# Altium PCB ECE362_BuckV2.PcbDoc (part 2 of 2)
Units mm, origin at the board's own origin, x right, y up, seen from the top; angles counter-clockwise.
Board outline 100 x 80 mm, 4 copper layers (Top Layer, GND, Power, Bottom Layer), stack 1.586 mm thick; 122 components, 85 nets, 403 pads, 248 vias.
Unrouted connection lines stored in the file: 1.
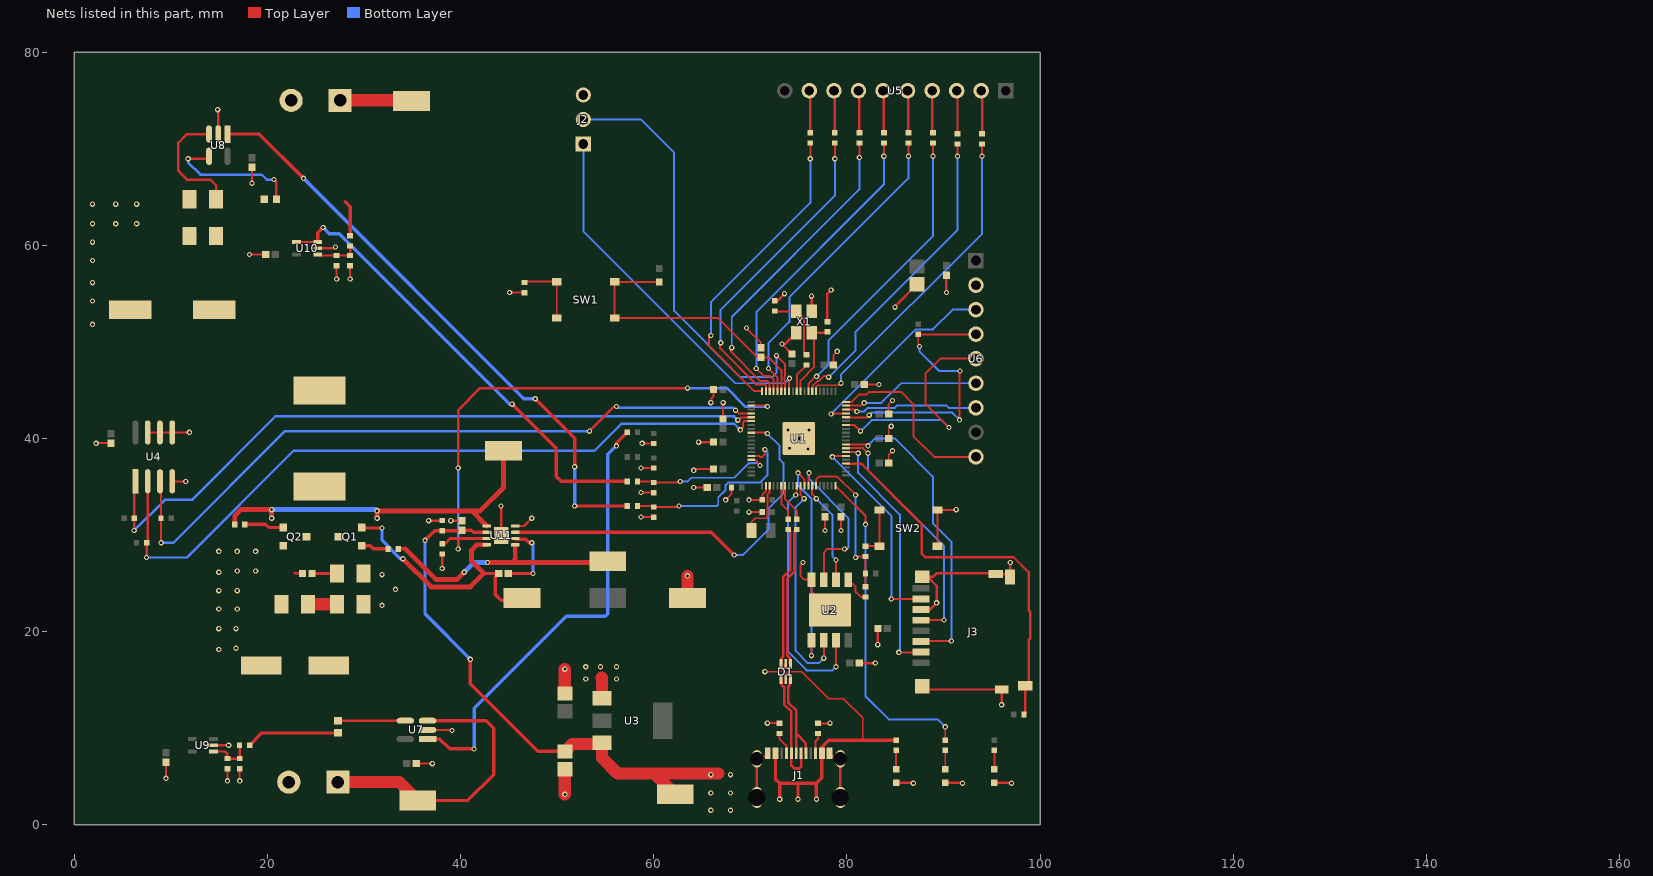
[diagram p4: the nets of this part, all layers, seen from the top]

## Via types
v1: diameter 0.55, hole 0.3, Top Layer to Bottom Layer, 248 vias

## Nets (pads, with @x,y where several pads share a name; then routed paths per layer and width w, separated by ;. In a path a pad name is that pad's centre, name@x,y a point inside that pad or via, vN(x,y) a via of type N, cw(c..) or ccw(c..) an arc to the next point about the centre after c; other vN are vias at no path point) (continued)
ADC4: C34.2 R33.2 U1.55 | length 20.4
  Top Layer w0.203: R33.2@58.31,33.02 59.89,33.02 C34.2@60,32.91 62.501,32.91 v1(62.611,33.02) ; U1.55@70.103,38.2 70.893,38.2 70.993,38.1 71.247,38.1 71.501,38.354 v1(71.501,38.862)
  Bottom Layer w0.203: v1(62.611,33.02) 66.548,33.02 66.675,33.147 66.675,33.909 67.437,34.671 67.437,35.179 67.691,35.433 70.993,35.433 71.755,36.195 71.755,38.608 v1(71.501,38.862)
ADC5: C30.2 R31.2 U1.56 | length 14.9
  Top Layer w0.203: R31.2@58.31,35.56 59.89,35.56 C30.2@60,35.45 62.628,35.45 v1(62.738,35.56) ; U1.56@70.103,37.8 70.417,37.8 70.478,37.739 70.586,37.739 70.588,37.739 70.722,37.605 70.722,37.495 v1@70.993,37.224
  Bottom Layer w0.203: v1(62.738,35.56) 63.5,35.56 63.881,35.941 68.326,35.941 69.85,37.465 70.739,37.465 v1(70.993,37.211)
BOOTSEL: R4.1 SW2.2 SW2.4 | length 5.2
  Top Layer w0.203: R4.1@81.915,28.846 81.928,28.859 SW2.2@83.36,28.859 SW2.4@83.36,32.609
BOOTSEL_X: R4.2 R5.2 R37.1 U1.75 | length 16.4
  Top Layer w0.203: U1.75@76.8,35.103 76.8,35.779 77.089,36.068 78.994,36.068 v1(80.899,34.163) ; v1(80.899,27.686) 81.009,27.796 R4.2@81.915,27.796 R37.1@81.915,26.035 R5.2@81.915,24.655
  Bottom Layer w0.203: v1(80.899,27.686) v1(80.899,34.163)
Col1: R16.1 U5.2 | length 4.5
  Top Layer w0.254: U5.2@93.89,76 93.98,75.91 R16.1@93.98,71.535
Col1_X: R16.2 U1.26 | length 34
  Top Layer w0.203: U1.26@76.8,44.897 76.808,44.905 76.808,45.329 76.995,45.516 79.077,45.516 79.281,45.72 v1(79.375,45.72) ; v1(93.98,69.215) R16.2@93.98,70.485
  Bottom Layer w0.203: v1(79.375,45.72) 79.375,46.609 93.98,61.214 v1(93.98,69.215)
Col2: R17.1 U5.3 | length 4.5
  Top Layer w0.254: U5.3@91.35,76 91.44,75.91 R17.1@91.44,71.535
Col2_X: R17.2 U1.27 | length 32.4
  Top Layer w0.203: U1.27@76.4,44.897 76.408,44.905 76.408,45.396 76.943,45.93 77.073,45.93 77.624,46.482 77.978,46.482 v1(78.105,46.355) ; v1(91.44,69.215) R17.2@91.44,70.485
  Bottom Layer w0.203: v1(78.105,46.355) 80.899,49.149 80.899,51.054 91.44,61.595 v1(91.44,69.215)
Col3: R18.1 U5.4 | length 4.4
  Top Layer w0.254: U5.4@88.81,76 88.81,71.735 R18.1@88.9,71.645
Col3_X: R18.2 U1.28 | length 31.1
  Top Layer w0.203: U1.28@76,44.897 76,45.647 76.787,46.434 v1(76.864,46.434) ; v1(88.9,69.215) R18.2@88.9,70.595
  Bottom Layer w0.203: v1(76.864,46.434) 78.055,47.625 78.105,47.625 78.105,50.165 88.9,60.96 v1(88.9,69.215)
Col4: R19.1 U5.5 | length 4.4
  Top Layer w0.254: U5.5@86.27,76 86.36,75.91 R19.1@86.36,71.645
Col4_X: R19.2 U1.36 | length 32.1
  Top Layer w0.203: v1(71.882,47.244) 72.8,46.326 U1.36@72.8,44.897 ; v1(86.36,69.215) R19.2@86.36,70.595
  Bottom Layer w0.203: v1(71.882,47.244) 71.882,49.911 74.041,52.07 74.041,54.61 86.36,66.929 v1(86.36,69.215)
CS_X: R5.1 U2.1 | length 2.8
  Top Layer w0.203: U2.1@80.137,25.4 80.899,24.638 80.899,24.13 81.424,23.605 R5.1@81.915,23.605
FLASH_SClK: U1.71 U2.6 | length 23.1
  Top Layer w0.203: U1.71@75.2,35.103 75.2,34.147 v1(75.565,33.782) ; v1(77.597,17.272) U2.6@77.597,19.1
  Bottom Layer w0.203: v1(75.565,33.782) 74.676,32.893 74.676,18.034 75.946,16.764 77.089,16.764 v1(77.597,17.272)
GD_EN: R13.2 U1.42 U11.7 | length 55.7
  Top Layer w0.203: U1.42@70.103,43.4 71.662,43.4 v1(71.755,43.307)
  Top Layer w0.272: R13.2@38.1,29.1 38.371,29.1 38.918,29.647 39.751,29.647 ; v1(39.751,28.575) 39.751,29.647 ; v1(39.751,36.957) 39.751,42.926 42.037,45.212 v1(63.5,45.212) ; U11.7@42.721,29.647 39.751,29.647
  Bottom Layer w0.272: v1(39.751,28.575) v1(39.751,36.957) ; v1(63.5,45.212) 67.564,45.212 69.469,43.307 v1(71.755,43.307)
GND: C1.1 C2.1 C3.1 C4.1 C5.1 C6.1 C7.1 C8.1 C9.1 C10.1 C11.1 C12.1 C13.1 C14.1 C15.1 C16.1 C17.1 C18.2 C19.2 C20.1 C21.1 C22.1 C23.1 C24.1 C25.1 C26.1 C27.1 C28.1 C29.1 C30.1 C31.1 C32.1 C33.1 C34.1 C35.1 C37.1 C38.1 C39.1 C40.1 C41.1 C42.1 C43.1 C44.1 C45.2 C46.2 C47.1 D1.2 D2.1 D3.1 D4.1 J1.1 J1.2 J1.3 J1.4 J1.A1-B12 J1.B1-A12 J2.3 J3.6 J3.10 J3.11 J3.12 J3.13 J3.14 J4.2 J5.2 J13.1 Q2.2 R7.1 R8.2 R9.2 R13.1 R27.1 R28.1 SW2.1 SW2.3 U1.62 U1.81 U2.4 U2.9 U3.1 U4.4 U4.5 U4.6 U4.7 U6.2 U7.2 U8.2 U9.2 U10.2 U11.4 U11.9 X1.2 X1.4 | length 159.6
  Top Layer w0.152: v1(71.501,15.875) 72.855,15.875 72.962,15.982 73.394,15.982 73.513,16.101 73.513,16.533 D1.2@73.66,16.68 ; C2.1@84.31,37.465 84.31,38.336 v1(84.709,38.735) ; C14.1@84.31,40.005 84.31,41.003 v1(84.582,41.275)
  Top Layer w0.203: v1(2.286,39.497) 2.304,39.515 C24.1@3.81,39.515 ; U4.7@7.62,40.625 U4.6@8.89,40.625 U4.5@10.16,40.625 11.923,40.625 v1(11.938,40.64) ; v1(9.525,4.826) C31.1@9.525,6.495 ; U4.4@10.16,35.575 11.542,35.575 v1(11.557,35.56) ; v1(15.875,4.572) C28.1@15.875,5.825 ; v1(17.145,4.572) R27.1@17.145,5.825 ; v1(18.161,59.055) C32.1@19.83,59.055 ; v1(27.178,56.515) C35.1@27.178,57.895 ; v1(28.575,56.515) R28.1@28.575,57.895 ; C27.1@35.415,6.35 v1(37.084,6.35) ; U7.2@36.591,9.845 39.05,9.845 v1(39.116,9.779) ; v1(45.085,55.118) 45.102,55.101 R7.1@46.609,55.101 ; v1(58.674,31.877) 58.691,31.86 C34.1@60,31.86 ; v1(58.674,34.417) 58.691,34.4 C30.1@60,34.4 ; v1(58.674,36.957) 58.691,36.94 C29.1@60,36.94 ; v1(58.801,39.497) 58.818,39.48 C33.1@60,39.48 ; v1(64.135,34.925) C8.1@65.55,34.925 ; v1(64.135,36.703) 64.262,36.83 C7.1@66.185,36.83 ; v1(65.913,43.709) 65.979,43.775 65.979,44.185 66.185,44.39 C4.1@66.185,45.085 ; C5.1@67.183,42.019 v1(67.183,43.709) ; v1(67.437,33.655) 68.055,34.273 C17.1@68.055,34.925 ; v1(69.596,51.435) 71.12,49.911 C21.1@71.12,49.385 ; v1(69.85,32.385) C12.1@71.23,32.385 ; v1(69.85,33.655) C13.1@71.23,33.655 71.247,33.672 71.247,34.163 71.605,34.521 71.605,35.098 U1.62@71.6,35.103 ; v1(71.755,10.541) R8.2@73,10.541 ; v1(73.279,49.784) 73.279,49.766 C15.1@74.295,48.75 ; v1(75.438,27.178) 75.184,26.924 75.184,25.781 75.565,25.4 U2.4@76.327,25.4 76.327,24.155 U2.9@78.232,22.25 ; R9.2@77,10.525 78.216,10.525 v1(78.232,10.541) ; v1(77.724,30.48) C10.1@77.724,31.895 ; C3.1@78.595,47.625 78.595,48.623 v1(78.994,49.022) ; v1(79.375,30.48) C9.1@79.375,31.895 ; C11.1@81.77,45.593 v1(83.312,45.593) ; C1.1@84.31,42.545 84.31,43.543 v1(84.709,43.942) ; SW2.1@89.36,28.859 SW2.3@89.36,32.609 91.283,32.609 v1(91.313,32.639)
  Top Layer w0.254: U9.2@14.435,8.255 v1(16.002,8.255) ; v1(14.859,74.041) 14.92,73.98 U8.2@14.92,71.516 ; v1(18.415,66.421) C26.1@18.415,68.09 ; 22.86,26.035 C43.1@23.64,26.035 ; U10.2@25.23,59.69 26.924,59.69 v1(27.051,59.817) ; v1(36.703,31.496) 36.72,31.513 C44.1@38.1,31.513 ; v1(38.1,26.543) R13.1@38.1,28.05 ; v1(38.989,31.496) 39.007,31.478 C37.1@40.132,31.478 ; v1(44.196,29.972) v1(44.196,33.02) ; U11.4@45.671,30.947 46.568,30.947 v1(47.371,31.75) ; v1(64.643,39.624) C16.1@66.185,39.624 ; J1.3@70.68,2.85 J1.1@70.68,6.85 71.225,6.85 J1.A1-B12@71.8,7.425 ; C22.1@72.517,54.246 72.788,54.246 v1(73.533,54.991) ; v1(73.279,49.784) 73.579,49.784 X1.4@74.765,50.97 ; v1(76.327,54.737) 76.365,54.699 X1.2@76.365,53.17 ; C23.1@77.978,52.087 77.978,54.991 v1(78.359,55.372) ; J1.B1-A12@78.2,7.425 78.775,6.85 J1.2@79.32,6.85 J1.4@79.32,2.85 ; C20.1@81.262,16.764 v1(82.931,16.764) ; v1(83.185,18.669) 83.203,18.687 C25.1@83.203,20.32 ; v1(84.963,53.594) 84.963,53.684 C46.2@87.249,55.97 ; D2.1@85.09,4.38 86.806,4.38 v1(86.868,4.318) ; J3.6@87.65,22.3 88.594,22.3 v1(89.281,22.987) 89.281,24.765 88.346,25.7 J3.13@87.775,25.7 88.946,25.7 89.281,26.035 95.315,26.035 J3.12@95.375,25.975 96.575,25.975 J3.10@96.875,25.675 96.875,27.152 v1(96.901,27.178) ; J3.14@87.775,14.35 88.1,14.025 J3.11@96.025,14.025 96.025,12.459 v1(96.012,12.446) ; D3.1@90.17,4.38 91.886,4.38 v1(91.948,4.318) ; v1(90.297,55.118) C47.1@90.297,56.914 ; D4.1@95.25,4.38 96.966,4.38 v1(97.028,4.318)
  Top Layer w1.27: v1(50.8,3.175) C18.2@50.8,5.768 ; C19.2@50.8,13.626 v1(50.8,16.129) ; 54.61,15.24 54.635,15.215 U3.1@54.635,13.095 ; J13.1@63.5,23.495 v1(63.5,25.781)
  other v1: 52.959,15.113 56.134,15.113 52.959,16.383 54.483,16.383 56.134,16.383 14.986,18.161 16.764,18.288 14.986,20.32 16.764,20.32 78.232,22.098 14.986,22.352 16.891,22.352 31.877,22.733 14.986,24.257 16.891,24.257 33.274,24.384 31.877,25.908 14.986,26.162 16.891,26.289 18.796,26.289 14.986,28.321 16.891,28.321 18.796,28.321 75.96,38.917 74.041,38.989 75.057,40.005 73.914,40.894 76.073,40.894 1.905,51.816 1.905,54.229 1.905,56.134 1.905,58.42 1.905,60.325 1.905,62.23 4.318,62.23 6.477,62.23 1.905,64.262 4.318,64.262 6.477,64.262
H_DRI: J6.1 R35.2 U11.1 | length 25.8
  Top Layer w0.35: R35.2@33.545,28.575 34.29,28.575
  Top Layer w0.5: 34.29,28.575 37.465,25.4 39.624,25.4 v1(40.386,26.162) ; v1(42.799,27.178) 45.339,27.178 ; U11.1@45.671,28.997 45.671,27.51 45.339,27.178 ; J6.1@55.245,27.305 55.118,27.178 45.339,27.178
  Bottom Layer w0.5: v1(40.386,26.162) 41.402,27.178 v1(42.799,27.178)
L_DRI: J7.1 R36.2 U11.5 | length 37.7
  Top Layer w0.5: R36.2@16.62,31.115 16.637,31.132 16.637,32.004 17.272,32.639 v1(20.447,32.639) v1(20.447,31.75) ; v1(31.369,31.75) v1(31.369,32.512) 41.156,32.512 ; U11.5@42.721,30.947 41.156,32.512 ; J7.1@44.45,38.735 44.45,34.925 42.037,32.512 41.156,32.512
  Bottom Layer w0.5: v1(20.447,32.639) 31.242,32.639 v1(31.369,32.512)
LED_D: R38.2 U1.80 | length 34
  Top Layer w0.203: U1.80@78.8,35.103 79.388,34.515 79.432,34.515 79.727,34.22 79.727,34.176 81.915,31.988 v1(81.915,31.115) ; R38.2@90.17,8.78 v1(90.17,10.16)
  Bottom Layer w0.203: v1(81.915,31.115) 81.915,13.335 84.328,10.922 89.408,10.922 v1(90.17,10.16)
NetC6_2: C6.2 C39.2 C40.2 C43.2 C45.1 Q1.3 R24.2 U7.4 | length 12.5
  Top Layer w0.254: R24.2@27.305,10.787 34.282,10.787 U7.4@34.29,10.795
  Top Layer w0.272: C43.2@24.62,26.035 C6.2@27.2,26.035
  Top Layer w1.27: C40.2@24.235,22.86 C39.2@27.2,22.86
NetC28_2: C28.2 R26.2 R27.2 U9.1 | length 4.7
  Top Layer w0.254: U9.1@14.435,7.605 15.636,7.605 15.875,7.366 C28.2@15.875,6.875 R27.2@17.145,6.875 17.128,6.892 R26.2@17.128,8.255
NetC35_2: C35.2 R28.2 R29.1 U10.1 | length 4.4
  Top Layer w0.254: U10.1@25.23,59.04 25.325,58.945 C35.2@27.178,58.945 R28.2@28.575,58.945 R29.1@28.575,59.927
NetC36_1: C36.1 U11.2 | length 7.7
  Top Layer w0.35: C36.1@44.94,26.035 v1(47.498,26.035) ; U11.2@45.671,29.647 45.727,29.591 46.736,29.591 47.117,29.21 v1(47.371,29.21)
  Bottom Layer w0.35: v1(47.371,29.21) 47.498,29.083 v1(47.498,26.035)
NetC38_2: C38.2 C41.2 C42.2 L2.2 R25.1 U8.3 | length 12.4
  Top Layer w0.254: U8.3@13.97,71.516 11.699,71.516 10.795,70.612 10.795,67.691 11.684,66.802 14.097,66.802 14.71,66.189 C41.2@14.71,64.77
NetD2_2: D2.2 R34.1 | length 1.9
  Top Layer w0.203: D2.2@85.09,5.78 R34.1@85.09,7.73
NetD3_2: D3.2 R38.1 | length 1.9
  Top Layer w0.203: D3.2@90.17,5.78 R38.1@90.17,7.73
NetD4_2: D4.2 R39.1 | length 1.9
  Top Layer w0.203: D4.2@95.25,5.78 R39.1@95.25,7.73
NetJ1_A5: J1.A5 R8.1 | length 2.4
  Top Layer w0.203: R8.1@73,9.475 73,8.915 73.75,8.165 J1.A5@73.75,7.425
NetJ1_B5: J1.B5 R9.1 | length 2.2
  Top Layer w0.203: J1.B5@76.75,7.425 76.75,8.678 77,8.928 R9.1@77,9.475
NetQ1_1: Q1.1 R35.1 | length 2.9
  Top Layer w0.35: Q1.1@29.775,28.895 30.668,28.895 30.988,28.575 R35.1@32.495,28.575
NetQ2_1: Q2.1 R36.1 | length 4.1
  Top Layer w0.35: R36.1@17.67,31.115 19.812,31.115 20.132,30.795 Q2.1@21.66,30.795
NetR2_1: R2.1 U1.67 | length 4
  Top Layer w0.203: U1.67@73.6,35.103 73.6,33.715 74.803,32.512 R2.1@74.803,31.64
NetR3_1: R3.1 U1.66 | length 3.8
  Top Layer w0.203: U1.66@73.2,35.103 73.2,33.226 73.914,32.512 R3.1@73.914,31.64
NetR6_2: R6.2 U1.31 | length 3.1
  Top Layer w0.203: U1.31@74.8,44.897 74.803,44.9 74.803,45.883 74.824,45.904 74.824,46.613 R6.2@75.819,47.608
NetR31_1: R31.1 U10.3 U10.4 | length 48
  Top Layer w0.254: U10.4@23.03,60.34 U10.3@25.23,60.34
  Top Layer w0.35: U10.3@25.23,60.34 25.23,61.298 v1(25.781,61.849) ; v1(45.339,43.561) 49.911,38.989 49.911,36.068 50.419,35.56 R31.1@57.26,35.56
  Bottom Layer w0.35: v1(25.781,61.849) 26.416,61.214 27.432,61.214 45.085,43.561 v1(45.339,43.561)
NetR32_1: R32.1 U7.1 | length 46.9
  Top Layer w0.35: U7.1@36.591,8.895 37.841,8.895 38.862,7.874 v1(41.402,7.874) ; v1(56.134,39.243) 56.134,39.514 R32.1@57.26,40.64
  Bottom Layer w0.35: v1(41.402,7.874) 41.402,12.065 50.927,21.59 54.991,21.59 55.245,21.844 55.245,38.354 v1(56.134,39.243)
NetR33_1: R33.1 U8.1 | length 61.4
  Top Layer w0.35: U8.1@15.87,71.516 19.162,71.516 v1(23.749,66.929) ; v1(47.735,44.118) 51.816,40.038 v1(51.816,37.084) ; v1(51.816,33.02) R33.1@57.26,33.02
  Bottom Layer w0.35: v1(23.749,66.929) 46.56,44.118 v1(47.735,44.118) ; v1(51.816,33.02) v1(51.816,37.084)
PHASE: C36.2 J8.1 L2.1 Q1.2 Q2.3 U11.8 | length 28.3
  Top Layer w0.35: Q1.2@29.775,30.795 29.836,30.734 v1(31.877,30.734) ; 42.418,26.035 C36.2@43.96,26.035 43.579,25.654 43.579,23.858 44.196,23.241 46.101,23.241 J8.1@46.355,23.495
  Top Layer w0.5: v1(34.036,27.559) 36.957,24.638 41.021,24.638 42.418,26.035 41.148,27.305 41.148,28.448 41.697,28.997 U11.8@42.721,28.997
  Bottom Layer w0.35: v1(31.877,30.734) 31.877,29.464 33.782,27.559 v1(34.036,27.559)
PWM8_A: U1.49 U11.3 | length 41.2
  Top Layer w0.203: U1.49@70.103,40.6 71.668,40.6 v1(71.755,40.513)
  Top Layer w0.35: U11.3@45.671,30.297 65.969,30.297 v1(68.326,27.94)
  Bottom Layer w0.203: v1(68.326,27.94) 69.215,27.94 71.882,30.607 71.882,32.766 73.406,34.29 73.406,37.465 73.025,37.846 73.025,39.243 v1(71.755,40.513)
Row1: R20.1 U5.6 | length 4.4
  Top Layer w0.254: U5.6@83.73,76 83.82,75.91 R20.1@83.82,71.645
Row1_X: R20.2 U1.37 | length 32.3
  Top Layer w0.203: v1(70.612,47.244) 71.374,46.482 72.009,46.482 72.4,46.091 U1.37@72.4,44.897 ; v1(83.82,69.215) R20.2@83.82,70.595
  Bottom Layer w0.203: v1(70.612,47.244) 70.612,53.086 83.82,66.294 v1(83.82,69.215)
Row2: R21.1 U5.7 | length 4.4
  Top Layer w0.254: U5.7@81.19,76 81.28,75.91 R21.1@81.28,71.645
Row2_X: R21.2 U1.38 | length 33.3
  Top Layer w0.203: v1(68.072,49.403) 68.008,49.34 68.008,48.959 70.993,45.974 71.755,45.974 72,45.729 U1.38@72,44.897 ; v1(81.28,69.088) R21.2@81.28,70.595
  Bottom Layer w0.203: v1(68.072,49.403) 68.072,52.578 81.28,65.786 v1(81.28,69.088)
Row3: R22.1 U5.8 | length 4.4
  Top Layer w0.254: U5.8@78.65,76 78.74,75.91 R22.1@78.74,71.645
Row3_X: R22.2 U1.39 | length 33.1
  Top Layer w0.203: v1(66.929,49.911) 66.865,49.847 66.865,49.34 70.612,45.593 71.501,45.593 71.6,45.494 U1.39@71.6,44.897 ; v1(78.74,68.961) R22.2@78.74,70.595
  Bottom Layer w0.203: v1(66.929,49.911) 66.929,53.34 78.74,65.151 v1(78.74,68.961)
Row4: R23.1 U5.9 | length 4.4
  Top Layer w0.254: U5.9@76.11,76 76.2,75.91 R23.1@76.2,71.645
Row4_X: R23.2 U1.40 | length 32.8
  Top Layer w0.203: v1(65.913,50.673) 65.732,50.492 65.732,49.584 70.419,44.897 U1.40@71.2,44.897 ; v1(76.2,68.961) R23.2@76.2,70.595
  Bottom Layer w0.203: v1(65.913,50.673) 65.913,54.102 76.2,64.389 v1(76.2,68.961)
RUN: C21.2 D5.1 SW1.2 SW1.4 U1.35 | length 30
  Top Layer w0.203: D5.1@60.579,56.196 55.994,56.196 SW1.2@55.959,56.231 SW1.4@55.959,52.481 66.645,52.481 70.721,48.405 C21.2@71.12,48.405 71.138,48.387 71.882,48.387 73.2,47.069 U1.35@73.2,44.897
RUN_X: R7.2 SW1.1 SW1.3 | length 7.1
  Top Layer w0.203: R7.2@46.609,56.151 46.689,56.231 SW1.1@49.959,56.231 SW1.3@49.959,52.481
SD_CS: J3.2 U1.7 | length 26.1
  Top Layer w0.203: U1.7@79.897,38.6 81.034,38.6 v1(81.153,38.481) ; v1(85.365,17.866) 87.616,17.866 J3.2@87.65,17.9
  Bottom Layer w0.203: v1(81.153,38.481) 81.153,36.449 85.471,32.131 85.471,17.972 v1(85.365,17.866)
SD_GND_DETECT: J3.9 R14.2 U1.4 | length 40.5
  Top Layer w0.254: U1.4@79.897,37.4 81.472,37.4 87.757,31.115 87.757,28.067 88.117,27.707 97.261,27.707 98.806,26.162 98.806,22.205 98.83,22.205 98.979,22.056 98.979,19.345 98.83,19.197 98.806,19.197 98.806,14.781 J3.9@98.45,14.425 98.45,11.565 R14.2@98.315,11.43
SD_MISO: J3.7 U1.6 | length 21.8
  Top Layer w0.203: v1(78.486,38.1) 78.586,38.2 U1.6@79.897,38.2 ; v1(84.591,23.383) 87.633,23.383 J3.7@87.65,23.4
  Bottom Layer w0.203: v1(78.486,38.1) 84.591,31.995 v1(84.591,23.383)
SD_MOSI: J3.3 U1.9 | length 32
  Top Layer w0.203: U1.9@79.897,39.4 82.012,39.4 v1(82.169,39.243) ; J3.3@87.65,19 87.7,19.05 v1(90.805,19.05)
  Bottom Layer w0.203: v1(82.169,39.243) 82.931,40.005 84.963,40.005 88.9,36.068 88.9,31.242 90.805,29.337 v1(90.805,19.05)
SD_SCLK: J3.5 U1.8 | length 25.4
  Top Layer w0.203: U1.8@79.897,39 81.65,39 v1(82.169,38.481) ; J3.5@87.65,21.2 87.659,21.209 v1(90.043,21.209)
  Bottom Layer w0.203: v1(82.169,38.481) 82.169,36.703 90.043,28.829 v1(90.043,21.209)
SIO0: U1.72 U2.5 | length 22.7
  Top Layer w0.203: v1(74.93,36.449) 75.6,35.779 U1.72@75.6,35.103 ; v1(76.327,17.526) U2.5@76.327,19.1
  Bottom Layer w0.203: v1(74.93,36.449) 74.93,35.179 76.327,33.782 v1(76.327,17.526)
SIO1: U1.74 U2.2 | length 10.7
  Top Layer w0.203: U1.74@76.4,35.103 76.4,34.213 v1(76.831,33.782) ; U2.2@78.867,25.4 v1(78.867,27.432)
  Bottom Layer w0.203: v1(76.831,33.782) 78.486,32.127 78.486,27.813 v1(78.867,27.432)
SIO2: U1.73 U2.3 | length 16.4
  Top Layer w0.203: U1.73@76,35.103 76,36.376 v1(76.073,36.449) ; U2.3@77.597,25.4 77.597,28.194 77.978,28.575 v1(79.756,28.575)
  Bottom Layer w0.203: v1(76.073,36.449) 76.073,35.814 80.137,31.75 80.137,28.702 80.01,28.575 v1(79.756,28.575)
SIO3: U1.70 U2.7 | length 26.2
  Top Layer w0.203: v1(74.696,34.163) 74.696,34.257 74.8,34.36 U1.70@74.8,35.103 ; v1(78.867,16.383) U2.7@78.867,19.1
  Bottom Layer w0.203: v1(74.696,34.163) 73.914,33.381 73.914,17.907 75.819,16.002 78.486,16.002 v1(78.867,16.383)
SWCLK: J2.1 U1.33 | length 38.4
  Top Layer w0.203: U1.33@74,44.897 74,46.187 v1(74.041,46.228)
  Bottom Layer w0.203: J2.1@52.705,70.485 52.705,61.468 68.453,45.72 73.533,45.72 v1(74.041,46.228)
SWDIO: J2.2 U1.34 | length 46.7
  Top Layer w0.203: v1(72.707,48.578) 73.6,47.685 73.6,46.499 73.537,46.437 73.537,46.019 73.6,45.957 U1.34@73.6,44.897
  Bottom Layer w0.203: J2.2@52.705,73.025 58.674,73.025 62.103,69.596 62.103,53.213 68.961,46.355 72.263,46.355 72.707,46.799 v1(72.707,48.578)
TFT_CS: U1.17 U6.3 | length 21
  Top Layer w0.203: v1(78.359,42.545) 78.414,42.6 U1.17@79.897,42.6
  Bottom Layer w0.203: v1(78.359,42.545) 87.122,51.308 88.9,51.308 90.932,53.34 U6.3@93.345,53.34
TFT_DC: U1.14 U6.5 | length 24.1
  Top Layer w0.203: U1.14@79.897,41.4 80.774,41.4 v1(81.407,40.767) ; v1(90.551,41.148) 88.138,43.561 88.138,46.736 89.662,48.26 U6.5@93.345,48.26
  Bottom Layer w0.203: v1(81.407,40.767) 82.55,41.91 89.789,41.91 v1(90.551,41.148)
TFT_MISO: U1.20 U6.9 | length 18.6
  Top Layer w0.203: U1.20@79.897,43.8 80.503,43.8 81.28,44.577 82.042,44.577 82.296,44.831 85.598,44.831 86.868,43.561 86.868,40.259 89.027,38.1 U6.9@93.345,38.1
TFT_MOSI: U1.19 U6.6 | length 14.4
  Top Layer w0.203: U1.19@79.897,43.4 81.5,43.4 v1(81.788,43.688)
  Bottom Layer w0.203: v1(81.788,43.688) 83.566,43.688 85.598,45.72 U6.6@93.345,45.72
TFT_RESET: R15.1 U1.16 U6.4 | length 30.1
  Top Layer w0.203: U1.16@79.897,42.2 82.078,42.2 v1(82.296,42.418) ; v1(87.503,49.53) 87.376,49.657 R15.1@87.376,50.783 93.328,50.783 U6.4@93.345,50.8 ; v1(91.652,41.936) 91.652,46.948 v1(91.694,46.99)
  Bottom Layer w0.203: v1(82.296,42.418) 82.55,42.672 90.916,42.672 v1(91.652,41.936) ; v1(87.503,49.53) 87.503,49.022 89.535,46.99 v1(91.694,46.99)
TFT_SCLK: U1.18 U6.7 | length 13.9
  Top Layer w0.203: U1.18@79.897,43 80.825,43 v1(81.026,42.799)
  Bottom Layer w0.203: v1(81.026,42.799) 81.788,42.799 82.169,43.18 84.963,43.18 85.217,43.434 90.297,43.434 90.551,43.18 U6.7@93.345,43.18
TMP_INT: R12.1 U1.44 U4.3 | length 73.6
  Top Layer w0.203: v1(68.453,42.926) 68.779,42.6 U1.44@70.103,42.6
  Top Layer w0.254: U4.3@8.89,35.575 9,35.465 R12.1@9,31.75 9,29.227 v1(9.017,29.21) ; v1(53.34,40.767) 55.88,43.307 v1(56.134,43.307)
  Bottom Layer w0.254: v1(9.017,29.21) 10.287,29.21 21.844,40.767 v1(53.34,40.767) ; v1(56.134,43.307) 56.261,43.18 64.262,43.18 68.199,43.18 v1(68.453,42.926)
TMP_SCL: R10.1 U1.46 U4.2 | length 77.2
  Top Layer w0.203: v1(68.961,40.894) 69.215,41.148 69.215,41.656 69.355,41.796 U1.46@70.099,41.796
  Top Layer w0.254: v1(7.493,27.686) 7.51,27.703 R10.1@7.51,29.21 7.62,29.32 U4.2@7.62,35.575
  Bottom Layer w0.254: v1(7.493,27.686) 11.68,27.686 22.729,38.735 53.848,38.735 56.642,41.529 68.326,41.529 v1(68.961,40.894)
TMP_SDA: R11.1 U1.45 U4.1 | length 74.2
  Top Layer w0.203: v1(68.7,41.903) 68.997,42.2 U1.45@70.103,42.2
  Top Layer w0.254: v1(6.223,30.48) 6.24,30.497 R11.1@6.24,31.75 6.24,35.465 U4.1@6.35,35.575
  Bottom Layer w0.254: v1(6.223,30.48) 9.398,33.655 12.192,33.655 20.828,42.291 68.312,42.291 v1(68.7,41.903)
USB_D_N: D1.4 J1.A7 J1.B7 | length 12
  Top Layer w0.272: D1.4@73.16,15.07 73.247,14.983 73.247,14.466 73.401,14.312 73.49,14.312 73.49,12.489 74.25,11.729 J1.B7@74.25,7.425 74.25,6.141 74.549,5.842 75.057,5.842 75.25,6.035 J1.A7@75.25,7.425
USB_D_P: D1.6 J1.A6 J1.B6 | length 10.5
  Top Layer w0.272: D1.6@74.16,15.07 74.073,14.983 74.073,14.466 73.919,14.312 73.914,14.312 73.914,12.665 74.75,11.829 J1.A6@74.75,7.425 ; 74.803,9.398 75.75,8.451 J1.B6@75.75,7.425
USB_DX_N: D1.3 R3.2 | length 14.4
  Top Layer w0.272: D1.3@73.16,16.68 73.247,16.767 73.247,17.284 73.401,17.438 73.401,25.671 74.147,26.416 74.147,30.357 R3.2@73.914,30.59
USB_DX_P: D1.1 R2.2 | length 14.5
  Top Layer w0.272: D1.1@74.16,16.68 74.073,16.767 74.073,17.284 73.825,17.532 73.825,25.495 74.57,26.24 74.57,30.357 R2.2@74.803,30.59
UVBUS: C18.1 C37.2 C44.2 D1.5 J1.A4-B9 J1.B4-A9 J12.1 R34.2 U3.3 U11.6 | length 94.8
  Top Layer w0.152: D1.5@73.66,15.07 73.66,15.621 73.914,15.875 75.311,15.875 78.105,13.081 79.629,13.081 81.606,11.104 81.606,8.78
  Top Layer w0.35: v1(36.322,29.464) 37.321,30.463 C44.2@38.1,30.463 40.097,30.463 C37.2@40.132,30.498 41.13,30.498 41.331,30.297 U11.6@42.721,30.297 ; v1(41.021,17.145) 41.021,14.605 48.006,7.62 C18.1@50.8,7.62 ; J1.A4-B9@72.6,7.425 72.6,4.743 73.025,4.318 ; v1(73.025,2.667) 73.025,4.318 ; v1(74.93,2.667) 74.93,4.318 ; v1(76.835,2.667) 76.835,4.318 ; R34.2@85.09,8.78 81.606,8.78 78.122,8.78 77.4,8.058 J1.B4-A9@77.4,7.425 77.4,4.883 76.835,4.318 ; 73.025,4.318 74.93,4.318 ; 74.93,4.318 76.835,4.318
  Top Layer w1.27: C18.1@50.8,7.62 51.562,8.382 54.522,8.382 U3.3@54.635,8.495 54.635,6.96 56.261,5.334 60.071,5.334 ; J12.1@62.23,3.175 60.071,5.334 ; 66.675,5.334 60.071,5.334
  Bottom Layer w0.35: v1(36.322,29.464) 36.322,21.844 v1(41.021,17.145)
  other v1: 65.913,1.524 67.945,1.524 65.913,3.302 67.945,3.302 65.913,5.207 67.945,5.207
VIN: J4.1 J10.1 R24.1 R26.1 U7.3 | length 39.7
  Top Layer w0.35: R26.1@18.178,8.255 19.448,9.525 27.297,9.525 R24.1@27.305,9.533 ; J10.1@35.56,2.54 40.767,2.54 43.434,5.207 43.434,10.033 42.672,10.795 U7.3@36.591,10.795
  Top Layer w1.27: J4.1@27.305,4.445 33.655,4.445 J10.1@35.56,2.54
VOUT: J5.1 J9.1 R25.2 R29.2 U8.4 | length 25.6
  Top Layer w0.254: v1(11.811,68.961) 13.716,68.961 U8.4@13.97,69.215 ; v1(20.701,66.802) 20.947,66.556 R25.2@20.947,64.77
  Top Layer w0.35: 28.067,64.516 28.575,64.008 R29.2@28.575,60.977
  Top Layer w1.27: J5.1@27.54,75 34.855,75 J9.1@34.925,74.93
  Bottom Layer w0.254: v1(11.811,68.961) 11.811,68.58 13.081,67.31 19.431,67.31 19.939,66.802 v1(20.701,66.802)
VREG_LX: L1.2 U1.63 | length 6.1
  Top Layer w0.203: L1.2@70.12,30.48 70.12,31.385 70.485,31.75 71.628,31.75 71.755,31.877 71.755,34.163 72.009,34.417 72,34.426 U1.63@72,35.103
XIN: C23.2 U1.30 X1.1 | length 8.4
  Top Layer w0.203: U1.30@75.2,44.897 75.2,45.99 76.581,47.371 76.581,50.754 X1.1@76.365,50.97
  Top Layer w0.254: X1.1@76.365,50.97 77.911,50.97 C23.2@77.978,51.037
XOUT: C22.2 R6.1 X1.3 | length 7.2
  Top Layer w0.203: C22.2@72.517,53.196 72.543,53.17 X1.3@74.765,53.17 75.565,52.37 75.565,48.912 R6.1@75.819,48.658
pads on no net: J1.A8 J1.B8 J3.1 J3.8 U1.1 U1.2 U1.3 U1.11 U1.12 U1.13 U1.21 U1.22 U1.23 U1.25 U1.43 U1.47 U1.48 U1.52 U1.57 U1.58 U1.77 U1.78 U1.79 U5.1 U5.10

## Polygon pours and split planes (outlines as drawn)
PHASE on Top Layer "VCC_MOS_VIA" (solid, remove dead copper, pour order 18): 23.622,29.464 25.019,29.464 25.019,30.607 30.099,30.607 30.099,32.004 28.321,32.004 28.321,36.684 28.3,36.705 22.5,36.705 22.5,34.005 22.479,33.984 22.479,31.877 23.622,31.877
VIN on Top Layer "VCC_MOS_VIA" (solid, remove dead copper, pour order 14): 26.162,3.302 26.162,10.033 28.194,10.033 28.575,9.652 28.575,3.302 26.035,3.302
VOUT on Top Layer "VCC_MOS_VIA" (solid, remove dead copper, pour order 13): 20.574,64.135 28.575,64.135 28.575,76.2 26.416,76.2 26.416,66.929 24.892,65.405 20.574,65.405
NetC38_2 on Top Layer "VCC_MOS_VIA" (solid, remove dead copper, pour order 11): 15.113,65.278 20.066,65.278 20.066,64.135 15.24,64.135 15.24,65.151
NetC38_2 on Top Layer "VCC_MOS_VIA" (solid, remove dead copper, pour order 10): 22.5,43.305 28.3,43.305 28.3,54.885 28.067,55.118 27.94,54.991 16.637,54.991 16.637,66.04 13.843,66.04 13.843,48.006 14.859,46.99 22.479,46.99 22.479,43.326
GND on Top Layer "VCC_MOS_VIA" (solid, remove dead copper, pour order 9): 8.001,50.927 0.889,50.927 0.889,66.04 1.016,66.167 1.143,66.04 12.827,66.04 12.827,59.69 8.001,59.69
GND on Top Layer "VCC_MOS_VIA" (solid, remove dead copper, pour order 8): 29.337,21.971 29.337,26.924 33.782,26.924 34.417,26.289 34.417,21.971
NetC6_2 on Top Layer "VCC_MOS_VIA" (solid, remove dead copper, pour order 7): 25.908,10.541 28.194,10.541 28.448,10.795 28.448,30.226 25.908,30.226
GND on Top Layer "VCC_MOS_VIA" (solid, remove dead copper, pour order 6): 21.209,12.319 21.336,12.446 21.336,21.082 22.479,21.082 22.606,21.209 22.606,25.146 23.749,25.146 23.876,25.273 23.876,28.829 23.368,29.337 14.224,29.337 14.224,12.319
UVBUS on Top Layer "VCC_MOS_VIA" (solid, remove dead copper, pour order 5): 65.151,6.35 68.834,6.35 68.834,0.635 65.151,0.635 65.151,6.223
UVBUS on Top Layer "VCC_MOS_VIA" (solid, remove dead copper, pour order 4): 72.6,4.743 72.74,4.883 77.4,4.883 77.4,1.594 77.343,1.651 72.644,1.651 72.644,4.699
+3.3V on Top Layer "VCC_MOS_VIA" (solid, remove dead copper, pour order 3): 62.484,14.097 66.04,14.097 66.04,7.112 62.484,7.112
GND on Top Layer "VCC_MOS_VIA" (solid, remove dead copper, pour order 2): 52.197,17.145 57.277,17.145 57.277,14.224 57.023,13.97 52.197,13.97
+1.1V on Top Layer "VCC_MOS_VIA" (solid, remove dead copper, pour order 1): 72.136,33.02 73.025,33.02 73.025,32.893 73.279,32.639 73.279,31.115 71.628,31.115 72.136,31.623
GND on Top Layer "GND_L01_P000" (solid, remove dead copper, pour order 0): 69.215,34.163 70.739,34.163 70.739,32.258 70.358,31.877 69.215,31.877
L_DRI on Bottom Layer "VCC_MOS_VIA" (solid, remove dead copper, pour order 16): 30.861,32.893 31.877,32.893 31.877,31.369 30.861,31.369
L_DRI on Bottom Layer "VCC_MOS_VIA" (solid, remove dead copper, pour order 15): 19.812,33.274 20.955,33.274 20.955,31.369 19.812,31.369
GND on GND (split plane): 99.49,0.51 0.51,0.51 0.51,79.49 99.49,79.49
+1.1V on Power (split plane): 76.325,44.377 75.981,44.034 75.953,43.992 75.944,43.942 75.953,43.892 75.981,43.85 77.251,42.58 77.293,42.552 77.343,42.543 83.691,42.543 83.691,40.007 77.851,40.007 77.801,39.998 77.759,39.97 77.731,39.928 77.722,39.878 77.722,37.467 75.6,37.467 75.55,37.458 75.508,37.43 75.48,37.388 75.471,37.338 75.471,34.706 75.471,29.974 71.757,29.974 71.757,32.949 73.371,34.562 73.399,34.604 73.408,34.654 73.408,36.957 73.399,37.007 73.371,37.049 73.329,37.077 73.279,37.086 66.296,37.086 66.296,39.622 71.12,39.622 71.17,39.631 71.212,39.659 71.24,39.701 71.249,39.751 71.249,40.459 73.371,42.58 73.399,42.622 73.408,42.672 73.408,48.968 73.587,49.147 76.325,49.147
UVBUS on Power (split plane): 77.468,6.169 77.468,0.891 65.28,0.891 65.28,6.221 77.416,6.221
+3.3V on Power (split plane): 99.49,0.51 77.622,0.51 77.647,0.515 77.689,0.543 77.717,0.585 77.726,0.635 77.726,6.223 77.717,6.273 77.689,6.315 77.562,6.442 77.52,6.47 77.47,6.479 65.151,6.479 65.101,6.47 65.059,6.442 65.031,6.4 65.022,6.35 65.022,0.762 65.031,0.712 65.059,0.67 65.101,0.642 65.151,0.633 77.416,0.633 77.442,0.607 77.505,0.543 77.547,0.515 77.572,0.51 0.51,0.51 0.51,79.49 99.49,79.49

## Other copper
Power (plane layer: these items are gaps in the copper):
  lines w0.254: 77.534,0.699 77.47,0.762 ; 77.47,0.762 65.151,0.762 65.151,6.35 77.47,6.35 77.597,6.223 77.597,0.635 77.47,0.762 ; 66.167,36.957 69.469,36.957 73.279,36.957 73.279,34.654 71.628,33.003 71.628,29.845 72.517,29.845 75.6,29.845 75.6,34.706 75.6,37.338 77.851,37.338 77.851,39.878 83.82,39.878 83.82,42.672 77.343,42.672 76.073,43.942 76.454,44.323 76.454,49.276 73.533,49.276 73.279,49.022 73.279,42.672 71.12,40.513 71.12,39.751 66.167,39.751 66.167,36.957

## Silkscreen, mask and mechanical layers (free items; w line width, h text height)
Top Overlay:
  drawing of 8 lines, arcs and shapes, not listed
  text "GND" at 42.164,75.184 h1.52
  text "SWDIO" at 42.164,72.009 h1.52
  text "SWCLK" at 42.164,68.834 h1.52
  text "Buck Boys" at 32.512,65.278 h1.52
  text "Andrew, Francis" at 32.385,62.738 h1.52
  text "George, Nolan" at 32.258,59.944 h1.52
  text "RESET" at 49.911,49.149 h1.52
  text "L_DRI" at 40.894,35.433 h1.52
  text "BOOTSEL" at 83.004,33.728 h1
  text "H_DRI" at 51.689,29.083 h1.52
  text "PHASE" at 42.799,19.939 h1.52
  text "3.3V" at 52.324,19.939 h1.52
  text "GND" at 61.214,19.939 h1.52
  text "UVBUS" at 81.226,1.724 h1
  text "DEBUG" at 87.83,1.724 h1
  text "+3.3V" at 94.053,1.724 h1

## Text inside footprints (layer, text, board x,y; h text height)
C45: Top Overlay "+" at 28.76,16.01 h0.5